# Altium PCB GripperTopBoard.PcbDoc (part 2 of 2)
Units mil, origin at the board's own origin, x right, y up, seen from the top; angles counter-clockwise.
Board outline 3129.83 x 3346.46 mil, 2 copper layers (Top Layer, Bottom Layer), stack 57 mil thick; 36 components, 15 nets, 87 pads, 97 vias.
Unrouted connection lines stored in the file: 53.
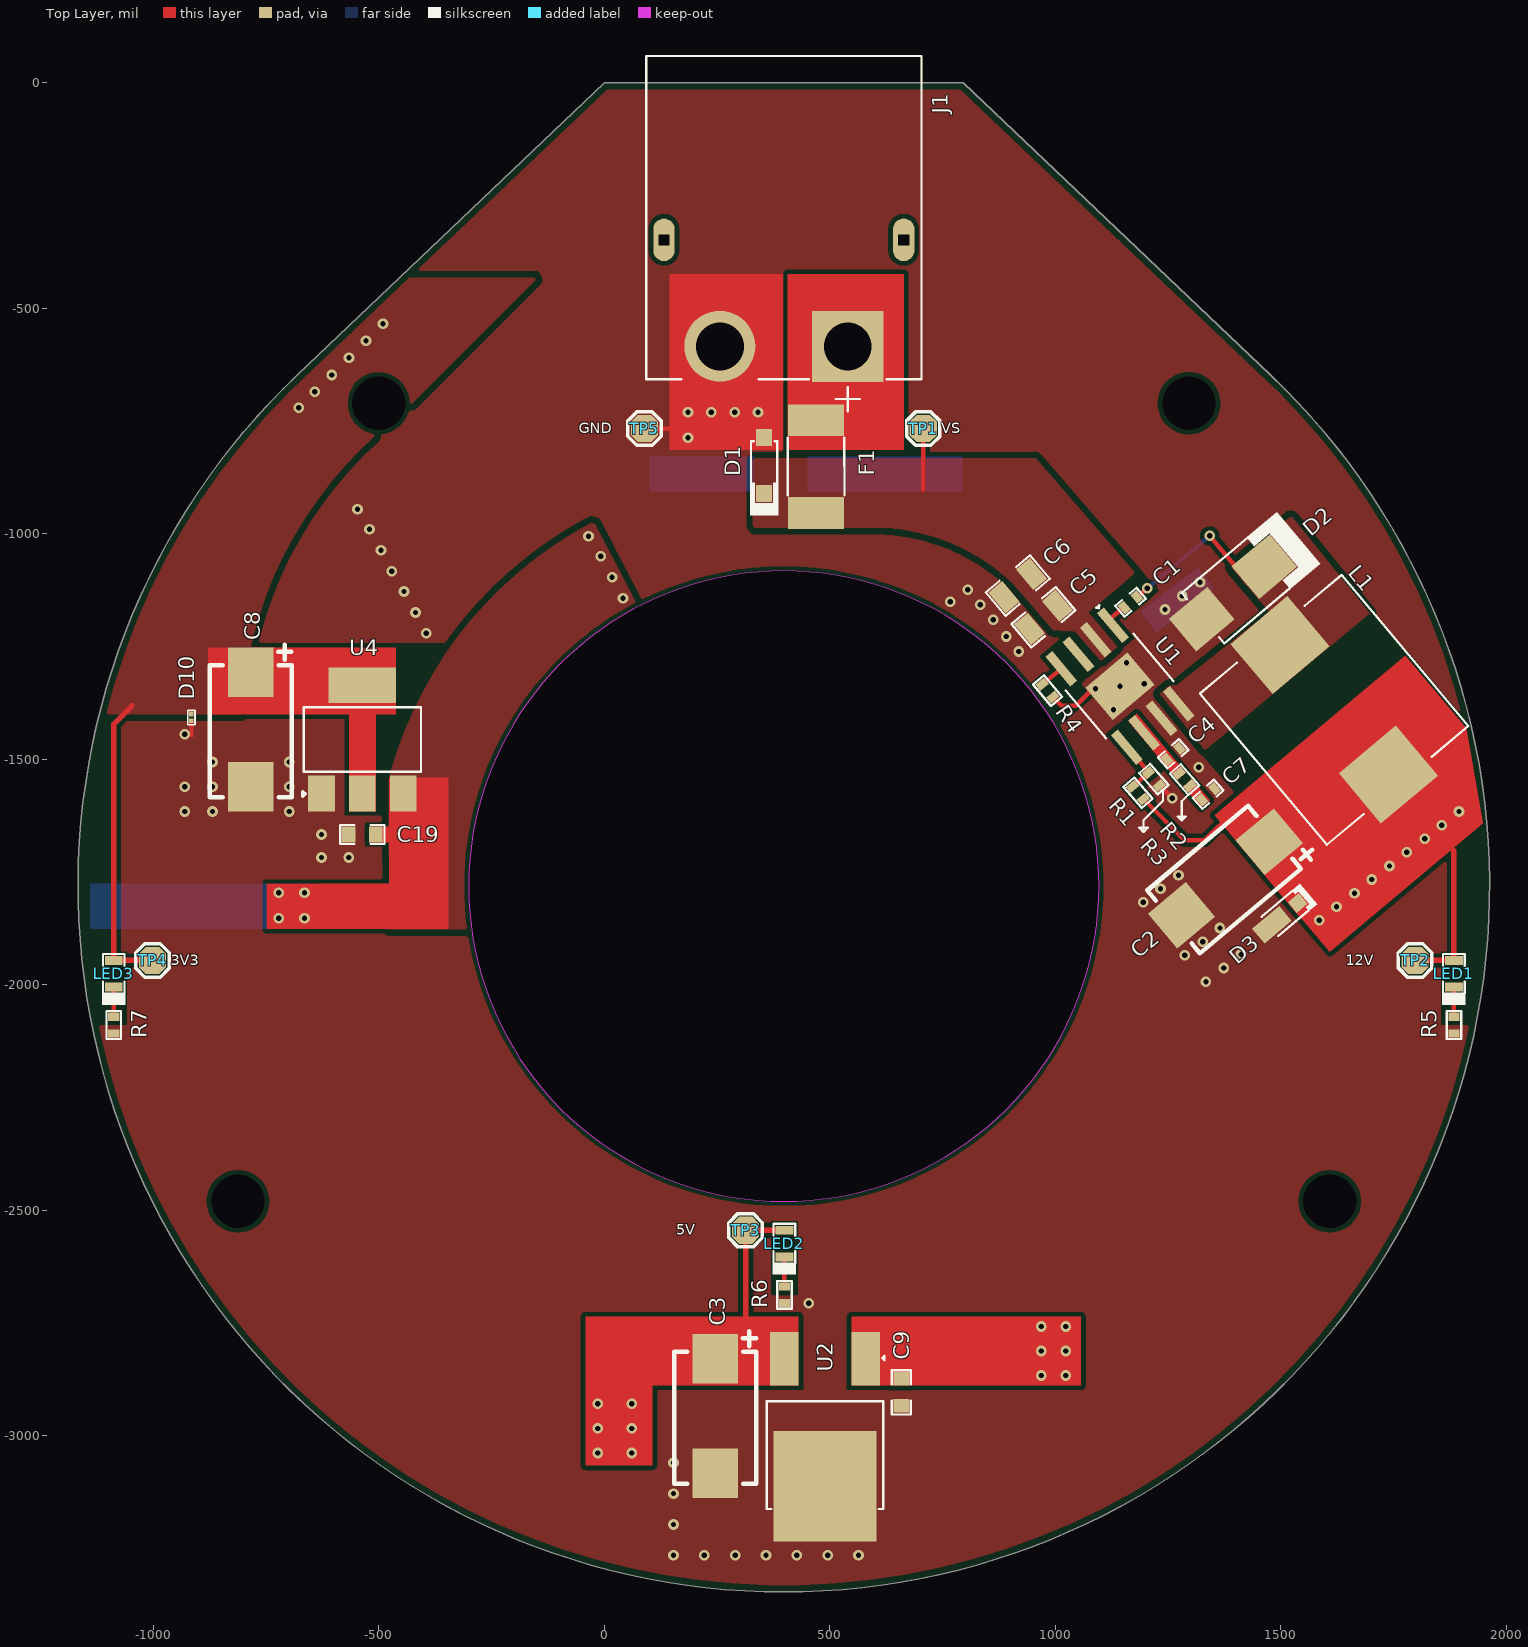
[diagram p0: Top Layer view]

## Silkscreen, mask and mechanical layers (free items; w line width, h text height) (continued)
Drill Drawing: (continued)
  text "= Routed Path Length + Tool Size = Slot length as defined in the PCB layout" at 708.99,574.99 h60